# Altium PCB PCB2.PcbDoc
Units mm, origin at the board's own origin, x right, y up, seen from the top; angles counter-clockwise.
Board outline 60.25 x 49.98 mm, 2 copper layers (Top Layer, Bottom Layer); 20 components, 8 nets, 156 pads, 0 vias.
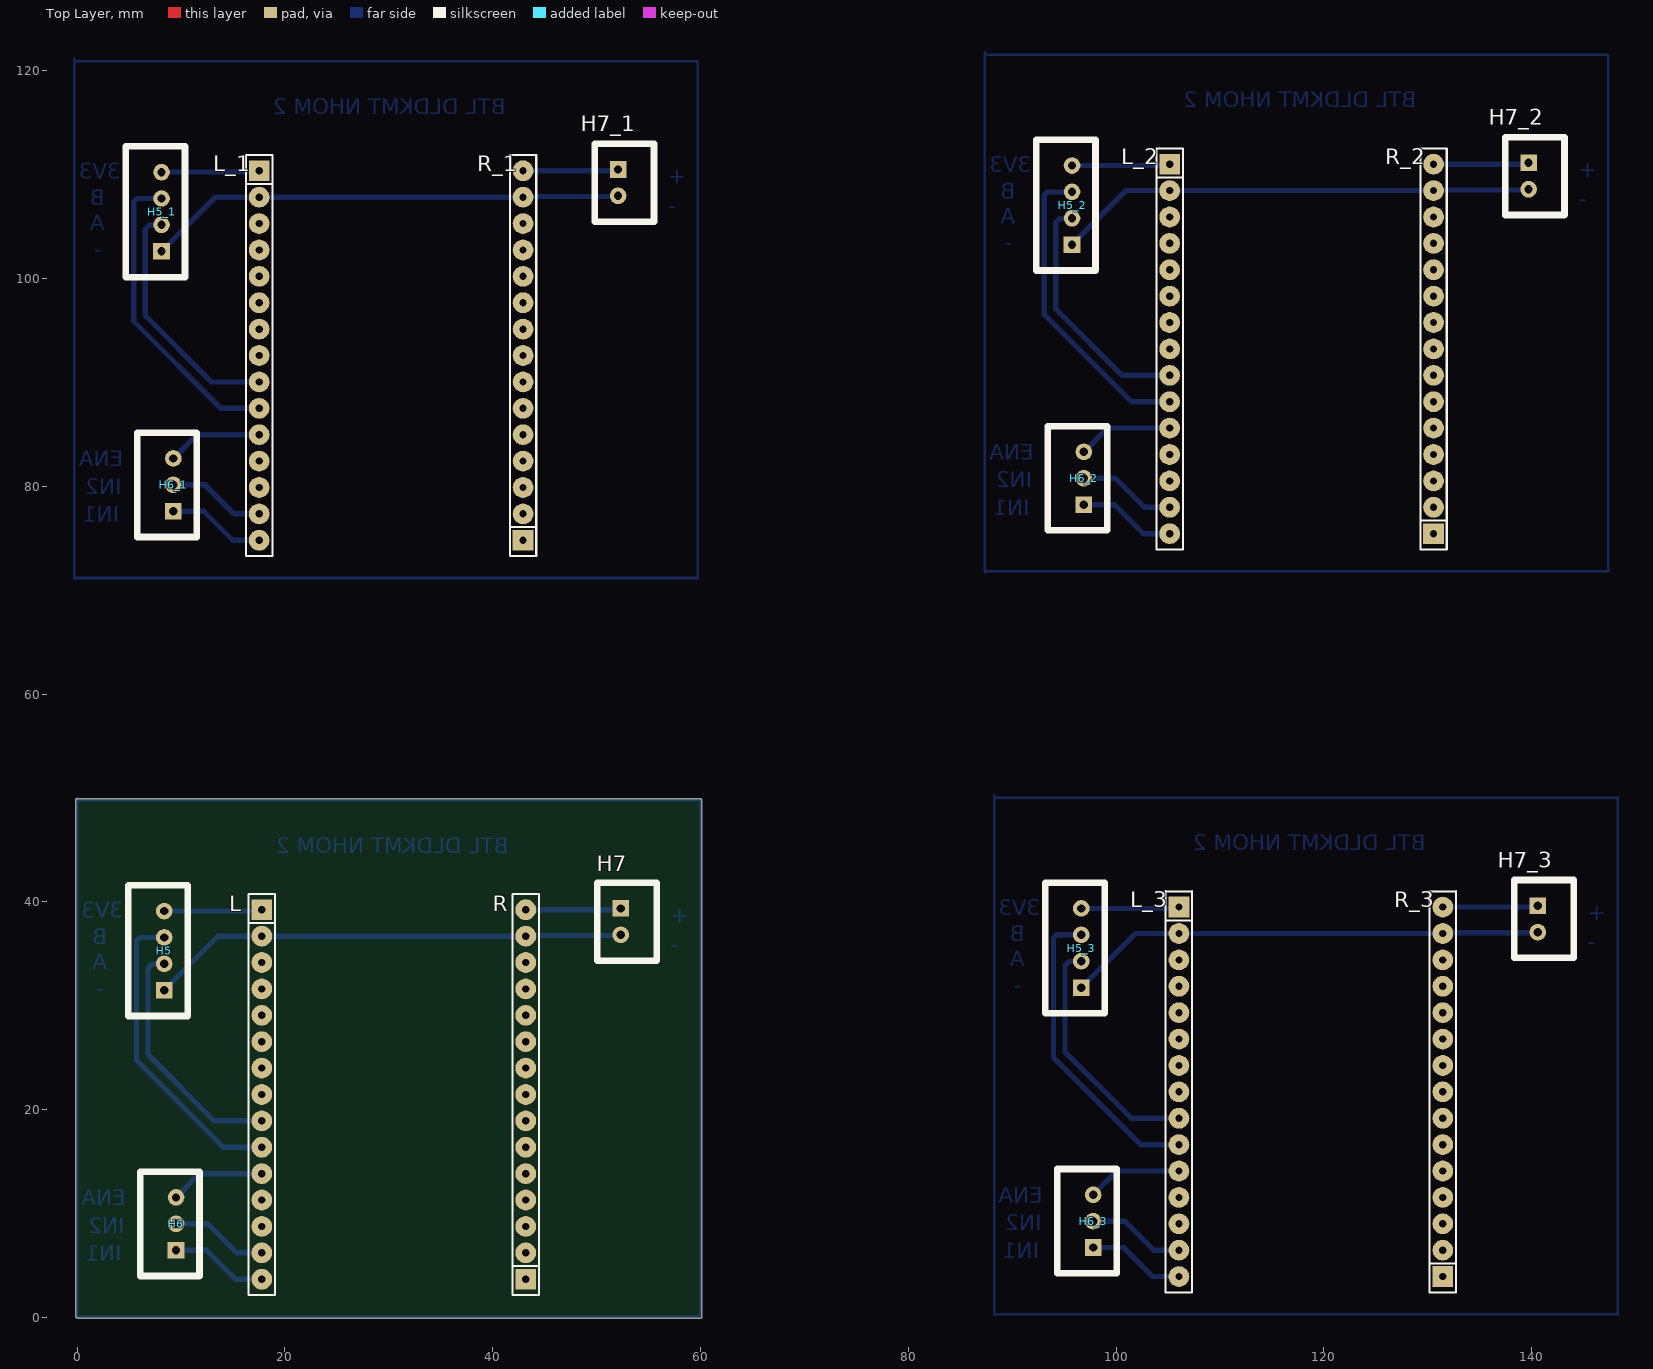
[diagram p0: Top Layer view]
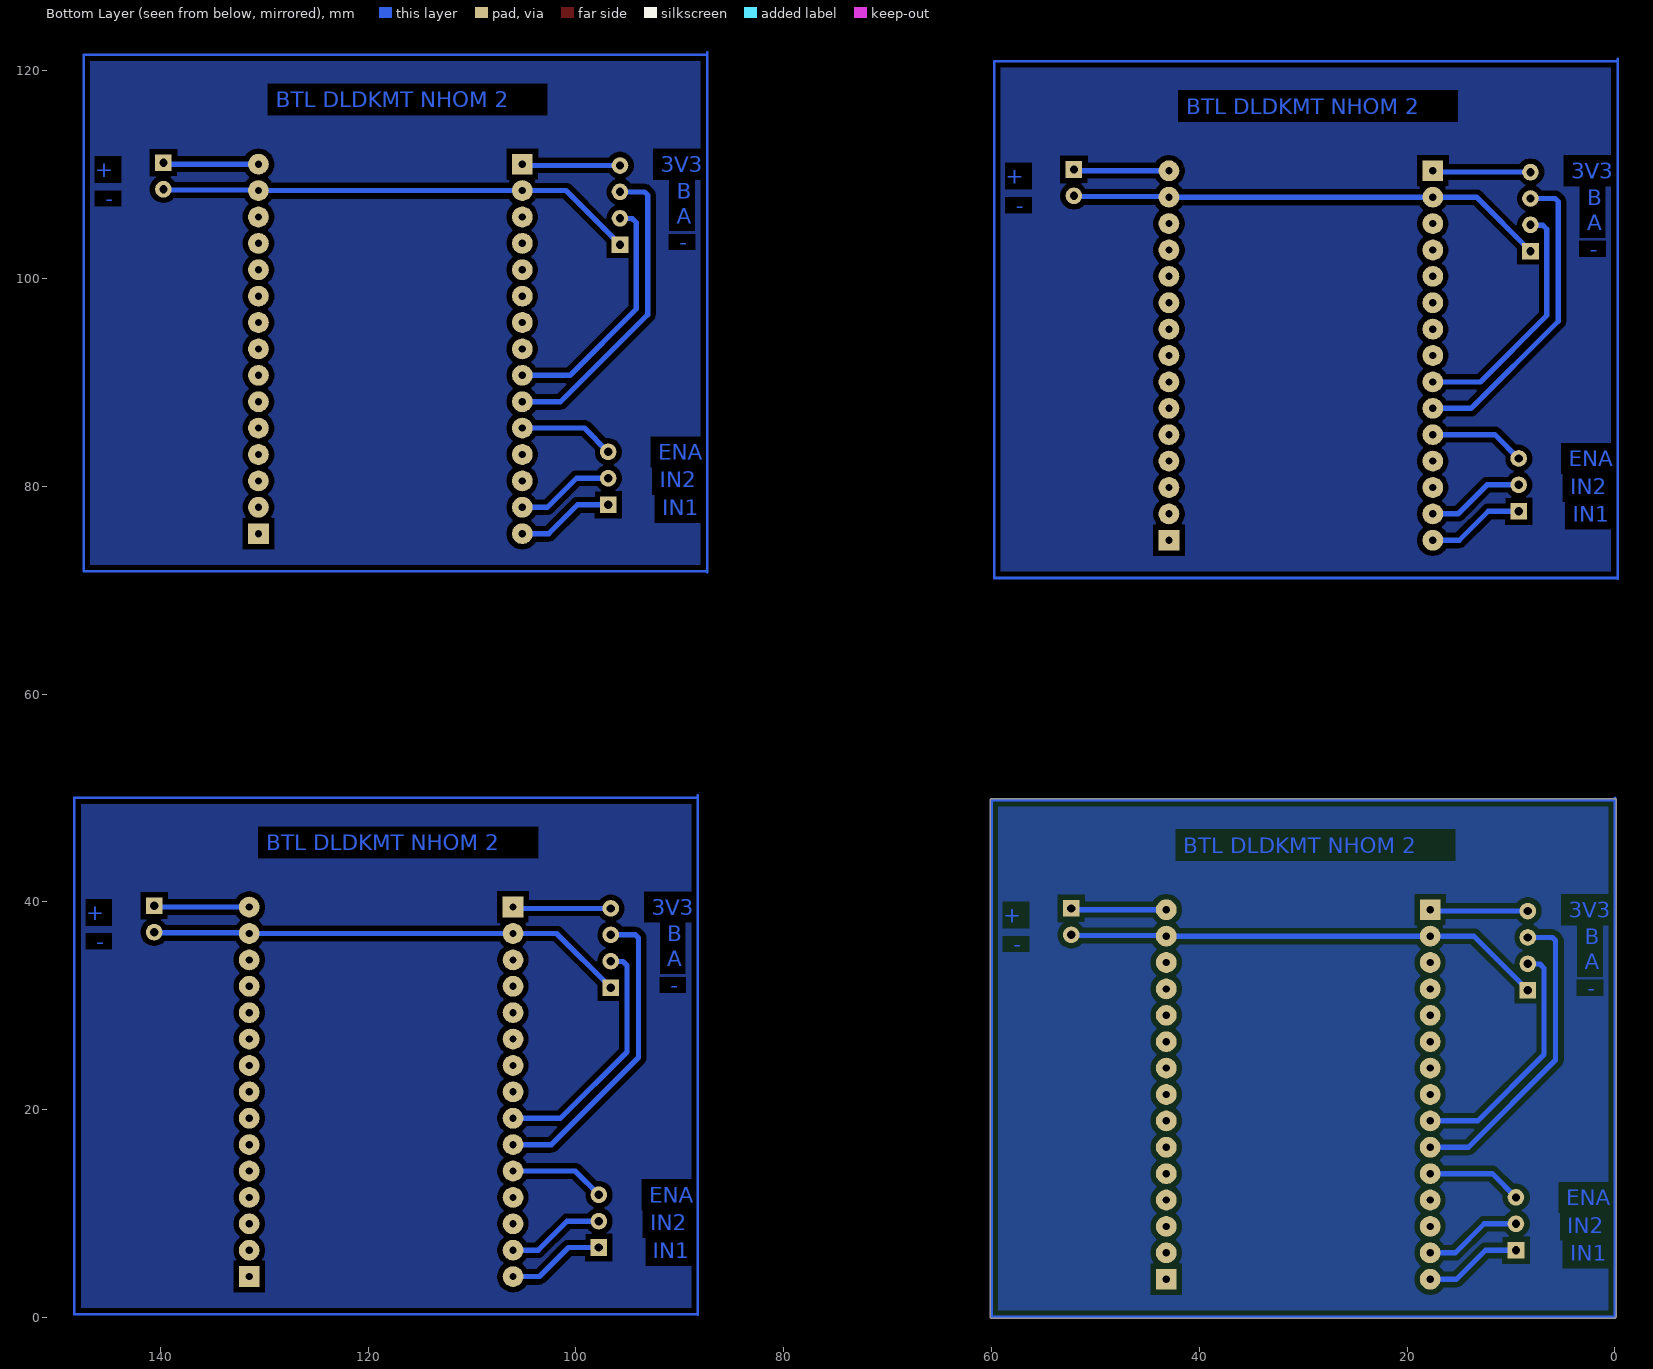
[diagram p1: Bottom Layer view, seen from below]

## Layer stack, top to bottom
Top Solder: solder mask 0.0102, Solder Resist, Dk 3.5
Top Layer: signal copper 0.0356
Dielectric 1: dielectric 0.32, FR-4, Dk 4.8
Bottom Layer: signal copper 0.0356
Bottom Solder: solder mask 0.0102, Solder Resist, Dk 3.5

## Board outline
-0.058,-0.002 cw(c0,0.112) -0.127,0.112 -0.127,49.784 cw(c0,49.784) 0,49.911 60,49.911 cw(c60,49.784) 60.127,49.784 60.127,0.056 cw(c60,0.056) 60,-0.071 0.056,-0.071 cw(c0.056,0.056)

## Design rules (kind name [scope] priority, off if disabled: settings)
Clearance [All] p1: gap=0.508 ignorepadtopadclearanceinfootprint=FALSE
PolygonConnect [All] p1: connectstyle=Relief reliefconductorwidth=0.254 reliefentries=4 polygonreliefangle="90 Angle" airgapwidth=0.254
RoutingVias [All] p1: holewidth=0.711 width=1.27 viastyle="Through Hole" minholewidth=0.711 minwidth=1.27 maxholewidth=0.711 maxwidth=1.27
SolderMaskExpansion [All] p1: expansion=0.102 istentingtop=FALSE
Width [All] p1: maxlimit=0.635 minlimit=0.508 preferedwidth=0.508 bottomlayer_maxwidth=0.508 minimp=50.000000 maximp=50.000000 favimp=50.000000
30 further rules are at their usual default settings.

## Classes and differential pairs
component class BTL: H5 H6 H7 L

## Components (designator, comment, footprint, x,y, rotation, side; value= is the part's Value field where it differs from the comment)
H5 "ENCODER" XH2.54M-4 8.382,31.496 r90 top
H5_1 "ENCODER" XH2.54M-4 8.128,102.616 r90 top (schematic designator H5)
H5_2 "ENCODER" XH2.54M-4 95.758,103.251 r90 top (schematic designator H5)
H5_3 "ENCODER" XH2.54M-4 96.647,31.75 r90 top (schematic designator H5)
H6 "L298N" XH2.54M-3 9.525,6.477 r90 top
H6_1 "L298N" XH2.54M-3 9.271,77.597 r90 top (schematic designator H6)
H6_2 "L298N" XH2.54M-3 96.901,78.232 r90 top (schematic designator H6)
H6_3 "L298N" XH2.54M-3 97.79,6.731 r90 top (schematic designator H6)
H7 "Nguồn" XH2.54M-2 52.324,39.37 r270 top
H7_1 "Nguồn" XH2.54M-2 52.07,110.49 r270 top (schematic designator H7)
H7_2 "Nguồn" XH2.54M-2 139.7,111.125 r270 top (schematic designator H7)
H7_3 "Nguồn" XH2.54M-2 140.589,39.624 r270 top (schematic designator H7)
L "JP15" JP15-C1T 17.78,39.243 r270 top (schematic designator R)
L_1 "JP15" JP15-C1T 17.526,110.363 r270 top (schematic designator R)
L_2 "JP15" JP15-C1T 105.156,110.998 r270 top (schematic designator R)
L_3 "JP15" JP15-C1T 106.045,39.497 r270 top (schematic designator R)
R "JP15" JP15-C1T 43.18,3.683 r90 top (schematic designator L)
R_1 "JP15" JP15-C1T 42.926,74.803 r90 top (schematic designator L)
R_2 "JP15" JP15-C1T 130.556,75.438 r90 top (schematic designator L)
R_3 "JP15" JP15-C1T 131.445,3.937 r90 top (schematic designator L)

## Footprints (in the part's own frame and the unit in brackets; to place one, negate y for a bottom-side part, rotate by r counter-clockwise, add the part's x,y. Pads: shape width x height; smd on the part's side, far side on the other; paste and mask are expansions set on the pad)
JP15-C1T [mm] "15 row, straight, gold plating"
  rect 2x2 hole 0.7: 1(0,0)
  round 2 hole 0.7: 2(2.54,0) 3(5.08,0) 4(7.62,0) 5(10.16,0) 6(12.7,0) 7(15.24,0) 8(17.78,0) 9(20.32,0) 10(22.86,0) 11(25.4,0) 12(27.94,0) 13(30.48,0) 14(33.02,0) 15(35.56,0)
  silkscreen extent -1.52,-1.27 37.08,1.27, body extent -1.52,-1.25 36.58,1.25, height 8.51
XH2.54M-2 [mm]
  rect 1.6x1.6 hole 0.8: 1(0,0)
  round 1.6 hole 0.8: 2(2.54,0)
  silkscreen extent -2.48,-2.26 5.02,3.46, body extent -2.48,-2.26 5.02,3.48, height 6.91
XH2.54M-3 [mm]
  rect 1.6x1.6 hole 0.8: 1(0,0)
  round 1.6 hole 0.8: 2(2.54,0) 3(5.08,0)
  silkscreen extent -2.48,-2.26 7.56,3.46, body extent -2.48,-2.26 7.56,3.48, height 6.91
XH2.54M-4 [mm]
  rect 1.6x1.6 hole 0.8: 1(0,0)
  round 1.6 hole 0.8: 2(2.54,0) 3(5.08,0) 4(7.62,0)
  silkscreen extent -2.48,-2.26 10.1,3.46, body extent -2.48,-2.26 10.1,3.48, height 6.91

## Part data
H5 H5_1 H5_2 H5_3: library part "Header 4P 2.54 Duc Thang", "Cắm", Chung_Loai=Cắm, Don_Vi=Con, Ma_Hang=MH001285, Ten_Linh_Kien="Header 4P XH2.54-4P Đực Thẳng"
H6 H6_1 H6_2 H6_3: library part "Header 3P 2.54 Duc Thang", "Cắm", Chung_Loai=Cắm, Don_Vi=Con, Ma_Hang=MH001292, Ten_Linh_Kien="Header 3P XH2.54-3P Đực Thẳng"
H7 H7_1 H7_2 H7_3: library part "Header 2P 2.54 Duc Thang", "Cắm", Chung_Loai=Cắm, Don_Vi=Con, Ma_Hang=MH001283, Ten_Linh_Kien="Header 2P XH2.54-2P Đực Thẳng"
L L_1 L_2 L_3 R R_1 R_2 R_3: "WR-PHD 2.54 mm Angled Socket Header", Manufacturer="W¨¹rth Elektronik eiSos GmbH", partNo=613015143121, ComponentLink1 Description=Manufacturer, ComponentLink1URL=http://www.we-online.com, ComponentLink2 Description=Datasheet, ComponentLink2URL=http://katalog.we-online.de/em/datasheet/6130xx143121.pdf, Created by="Karrer Zheng", Created Date="29 March 2013", NoPins=15

## Nets (pads, with @x,y where several pads share a name; then routed paths per layer and width w, separated by ;. In a path a pad name is that pad's centre, name@x,y a point inside that pad or via, vN(x,y) a via of type N, cw(c..) or ccw(c..) an arc to the next point about the centre after c; other vN are vias at no path point)
3V3: H5.4 L.1 | length 9.5
  Bottom Layer w0.508: H5.4 17.653,39.116 L.1
5V: H7.1 R.15 | length 9.2
  Bottom Layer w0.508: R.15 52.197,39.243 H7.1
A: H5.2 L.9 | length 23.6
  Bottom Layer w0.508: H5.2 8.357,34.011 7.214,34.011 6.82,33.617 6.82,25.311 13.208,18.923 L.9
B: H5.3 L.10 | length 29.8
  Bottom Layer w0.508: H5.3 6.013,36.576 5.715,36.278 5.715,24.765 14.097,16.383 L.10
ENA: H6.3 L.11 | length 9.2
  Bottom Layer w0.508: H6.3 11.811,13.843 L.11
GND: H5.1 H7.2 L.2 R.14 | length 46.2
  Bottom Layer w0.508: H5.1 13.589,36.703 R.14 43.243,36.767 52.261,36.767 H7.2
IN1: H6.1 L.15 | length 9.4
  Bottom Layer w0.508: H6.1 12.446,6.477 15.24,3.683 L.15
IN2: H6.2 L.14 | length 9.4
  Bottom Layer w0.508: H6.2 12.573,9.017 15.367,6.223 L.14
pads on no net: H5_1.1 H5_1.2 H5_1.3 H5_1.4 H5_2.1 H5_2.2 H5_2.3 H5_2.4 H5_3.1 H5_3.2 H5_3.3 H5_3.4 H6_1.1 H6_1.2 H6_1.3 H6_2.1 H6_2.2 H6_2.3 H6_3.1 H6_3.2 H6_3.3 H7_1.1 H7_1.2 H7_2.1 H7_2.2 H7_3.1 H7_3.2 L.3 L.4 L.5 L.6 L.7 L.8 L.12 L.13 L_1.1 L_1.2 L_1.3 L_1.4 L_1.5 L_1.6 L_1.7 L_1.8 L_1.9 L_1.10 L_1.11 L_1.12 L_1.13 L_1.14 L_1.15 L_2.1 L_2.2 L_2.3 L_2.4 L_2.5 L_2.6 L_2.7 L_2.8 L_2.9 L_2.10 L_2.11 L_2.12 L_2.13 L_2.14 L_2.15 L_3.1 L_3.2 L_3.3 L_3.4 L_3.5 L_3.6 L_3.7 L_3.8 L_3.9 L_3.10 L_3.11 L_3.12 L_3.13 L_3.14 L_3.15 R.1 R.2 R.3 R.4 R.5 R.6 R.7 R.8 R.9 R.10 R.11 R.12 R.13 R_1.1 R_1.2 R_1.3 R_1.4 R_1.5 R_1.6 R_1.7 R_1.8 R_1.9 R_1.10 R_1.11 R_1.12 R_1.13 R_1.14 R_1.15 R_2.1 R_2.2 R_2.3 R_2.4 R_2.5 R_2.6 R_2.7 R_2.8 R_2.9 R_2.10 R_2.11 R_2.12 R_2.13 R_2.14 R_2.15 R_3.1 R_3.2 R_3.3 R_3.4 R_3.5 R_3.6 R_3.7 R_3.8 R_3.9 R_3.10 R_3.11 R_3.12 R_3.13 R_3.14 R_3.15
copper on no net: | length 1516.3
  Bottom Layer w0.254: -0.254,71.12 -0.254,121.12 ; -0.254,71.232 -0.254,120.904 59.746,120.904 59.746,71.176 -0.198,71.176 ; 0,0 0,50 ; 0,0.112 0,49.784 60,49.784 60,0.056 0.056,0.056 ; 87.376,71.755 87.376,121.755 ; 87.376,71.867 87.376,121.539 147.376,121.539 147.376,71.811 87.432,71.811 ; 88.265,0.254 88.265,50.254 ; 88.265,0.366 88.265,50.038 148.265,50.038 148.265,0.31 88.321,0.31
  Bottom Layer w0.508: 8.128,102.616 13.335,107.823 42.926,107.823 42.989,107.886 52.006,107.886 52.07,107.95 ; 8.128,105.156 8.103,105.131 6.96,105.131 6.566,104.737 6.566,96.431 12.954,90.043 17.526,90.043 ; 8.128,107.696 5.759,107.696 5.461,107.398 5.461,95.885 13.843,87.503 17.526,87.503 ; 8.128,110.236 17.399,110.236 17.526,110.363 ; 9.271,77.597 12.192,77.597 14.986,74.803 17.526,74.803 ; 9.271,80.137 12.319,80.137 15.113,77.343 17.526,77.343 ; 9.271,82.677 11.557,84.963 17.526,84.963 ; 42.926,110.363 51.943,110.363 52.07,110.49 ; 95.758,103.251 100.965,108.458 130.556,108.458 130.619,108.521 139.636,108.521 139.7,108.585 ; 95.758,105.791 95.733,105.766 94.59,105.766 94.196,105.372 94.196,97.066 100.584,90.678 105.156,90.678 ; 95.758,108.331 93.389,108.331 93.091,108.033 93.091,96.52 101.473,88.138 105.156,88.138 ; 95.758,110.871 105.029,110.871 105.156,110.998 ; 96.647,31.75 101.854,36.957 131.445,36.957 131.508,37.02 140.525,37.02 140.589,37.084 ; 96.647,34.29 96.622,34.265 95.479,34.265 95.085,33.871 95.085,25.565 101.473,19.177 106.045,19.177 ; 96.647,36.83 94.278,36.83 93.98,36.532 93.98,25.019 102.362,16.637 106.045,16.637 ; 96.647,39.37 105.918,39.37 106.045,39.497 ; 96.901,78.232 99.822,78.232 102.616,75.438 105.156,75.438 ; 96.901,80.772 99.949,80.772 102.743,77.978 105.156,77.978 ; 96.901,83.312 99.187,85.598 105.156,85.598 ; 97.79,6.731 100.711,6.731 103.505,3.937 106.045,3.937 ; 97.79,9.271 100.838,9.271 103.632,6.477 106.045,6.477 ; 97.79,11.811 100.076,14.097 106.045,14.097 ; 130.556,110.998 139.573,110.998 139.7,111.125 ; 131.445,39.497 140.462,39.497 140.589,39.624

## Polygon pours and split planes (outlines as drawn)
no net on Bottom Layer "NONET_L02_P003" (solid, pour order 3): 88.265,50.038 148.265,50.038 148.265,0.31 148.209,0.254 88.265,0.254
no net on Bottom Layer "NONET_L02_P002" (solid, pour order 2): 87.376,121.539 147.376,121.539 147.376,71.811 147.32,71.755 87.376,71.755
no net on Bottom Layer "NONET_L02_P001" (solid, pour order 1): -0.254,120.904 59.746,120.904 59.746,71.176 59.69,71.12 -0.254,71.12
no net on Bottom Layer "NONET_L02_P000" (solid, pour order 0): 0,49.784 60,49.784 60,0.056 59.944,0 0,0

## Other copper
Bottom Layer:
  text "BTL DLDKMT NHOM 2" at 128.905,116.459 h1.52
  text "BTL DLDKMT NHOM 2" at 41.275,115.824 h1.52
  text "3V3" at 91.821,110.236 h1.52
  text "+" at 144.526,109.728 h1.52
  text "3V3" at 4.191,109.601 h1.52
  text "+" at 56.896,109.093 h1.52
  text "B" at 90.297,107.696 h1.52
  text "B" at 2.667,107.061 h1.52
  text "-" at 144.526,106.934 h1.52
  text "-" at 56.896,106.299 h1.52
  text "A" at 90.297,105.283 h1.52
  text "A" at 2.667,104.648 h1.52
  text "-" at 89.281,102.743 h1.52
  text "-" at 1.651,102.108 h1.52
  text "ENA" at 92.075,82.55 h1.52
  text "ENA" at 4.445,81.915 h1.52
  text "IN2" at 91.948,79.883 h1.52
  text "IN2" at 4.318,79.248 h1.52
  text "IN1" at 91.694,77.216 h1.52
  text "IN1" at 4.064,76.581 h1.52
  text "BTL DLDKMT NHOM 2" at 129.794,44.958 h1.52
  text "BTL DLDKMT NHOM 2" at 41.529,44.704 h1.52
  text "3V3" at 92.71,38.735 h1.52
  text "3V3" at 4.445,38.481 h1.52
  text "+" at 145.415,38.227 h1.52
  text "+" at 57.15,37.973 h1.52
  text "B" at 91.186,36.195 h1.52
  text "B" at 2.921,35.941 h1.52
  text "-" at 145.415,35.433 h1.52
  text "-" at 57.15,35.179 h1.52
  text "A" at 91.186,33.782 h1.52
  text "A" at 2.921,33.528 h1.52
  text "-" at 90.17,31.242 h1.52
  text "-" at 1.905,30.988 h1.52
  text "ENA" at 92.964,11.049 h1.52
  text "ENA" at 4.699,10.795 h1.52
  text "IN2" at 92.837,8.382 h1.52
  text "IN2" at 4.572,8.128 h1.52
  text "IN1" at 92.583,5.715 h1.52
  text "IN1" at 4.318,5.461 h1.52